# EAGLE board power_input (EAGLE 9.6.2)
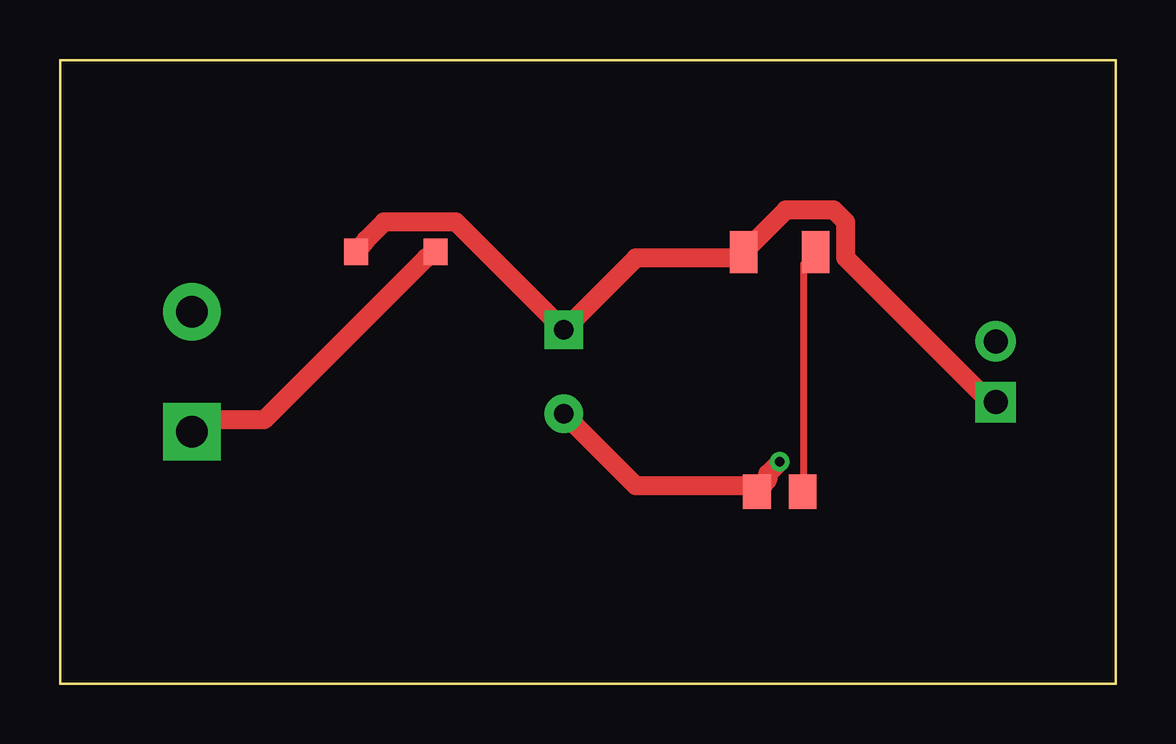
[diagram p0: board, top side]
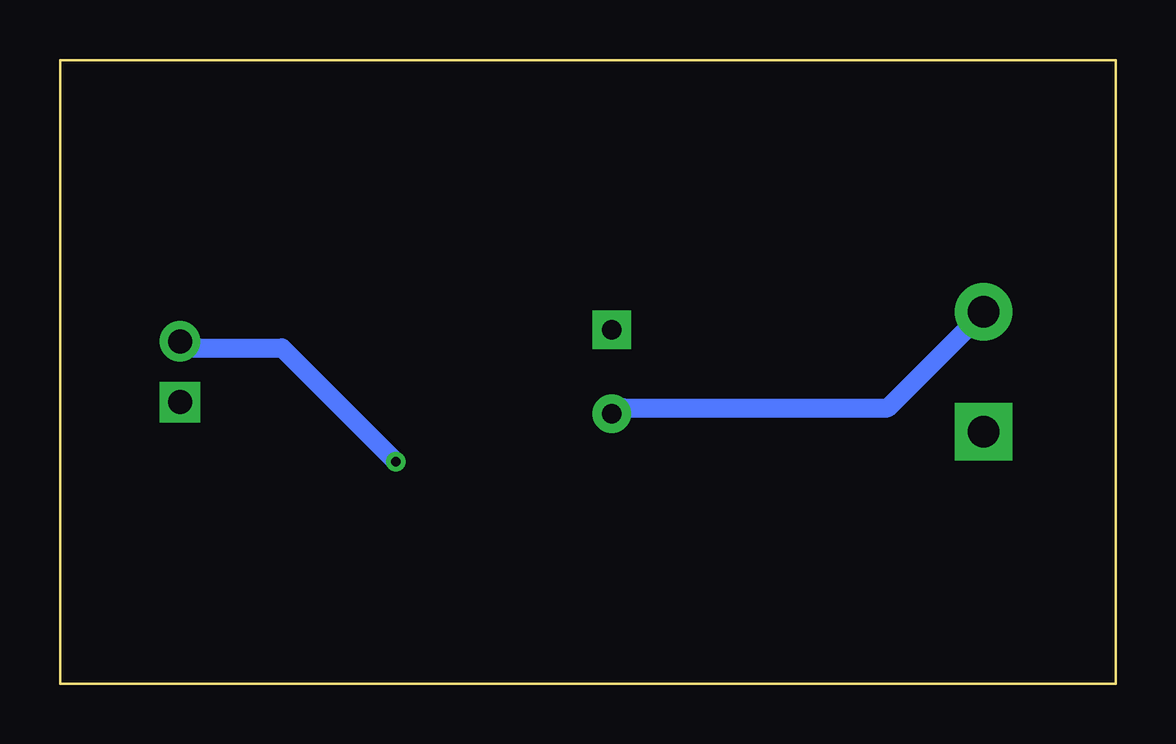
[diagram p1: board, bottom side, seen from below]

Size 44 x 26 mm. Coordinates in mm from the lower left corner, seen from the top.
Outline: 0,0 44,0 44,26 0,26 0,0
Copper layers used: Top, Bottom
Design rules "eh3d-kit": minimum track width 0.15mm, minimum drill 0.3mm, track to track 0.15mm, track to pad 0.15mm, pad to pad 0.15mm, via to via 0.15mm, smd to smd 0.15mm, copper to edge 0.3mm, drill to drill 0.25mm, minimum pad ring 0.15mm, minimum via ring 0.15mm

## Footprints (pad centres in the part's own frame; a part is rotated, then mirrored left to right if it is on the bottom)
C-ELEC-D8 = drill 0.8 pad 1.6 square: 1 -1.75,0 | drill 0.8 pad 1.6: 2 1.75,0
SOD-123 = smd 1 x 1.1: 1 -1.65,0; 2 1.65,0
LED-0805 = smd 1.15 x 1.45: 1 -0.95,0; 2 0.95,0
HDR-1X02 = drill 1 pad 1.7 square: 1 -1.27,0 | drill 1 pad 1.7: 2 1.27,0
CHIP-1206 = smd 1.15 x 1.75: 1 -1.5,0; 2 1.5,0
TERM-2P-5.0 = drill 1.3 pad 2.4 square: 1 -2.5,0 | drill 1.3 pad 2.4: 2 2.5,0

## Placement (x,y rotation side)
C1  220u  [C-ELEC-D8]  21,13 270 top
D1  SERIES  [SOD-123]  14,18 0 top
D2  GREEN  [LED-0805]  30,8 0 top
J1  OUT  [HDR-1X02]  39,13 90 top
R1  2k2  [CHIP-1206]  30,18 0 top
X1  IN  [TERM-2P-5.0]  5.5,13 90 top

## Library data of the parts
C1 D1 D2 J1 R1 X1 = eh3d-kit

## Nets
GND: C1.2 D2.1 J1.2 X1.2
LEDA: D2.2 R1.2
VIN: D1.2 X1.1
VOUT: C1.1 D1.1 J1.1 R1.1

## Tracks (layer width: path | path; a pad name or v marks a point on that pad's centre or on a via)
GND  (via drill 0.4 pad 0.8)
  Top 0.8: C1.2 24,8.25 28.5,8.25 D2.1 29.5,8.5 29.5,8.75 v30,9.25
  Bottom 0.8: C1.2 20.5,11.5 9.5,11.5 X1.2 | J1.2 38.5,14 34.75,14 v30,9.25
LEDA
  Top 0.3: D2.2 31,8.5 31,17.5 R1.2
VIN
  Top 0.8: D1.2 15.25,17.75 8.5,11 6,11 X1.1
VOUT
  Top 0.8: D1.1 12.75,18.5 13.5,19.25 16.5,19.25 C1.1 24,17.75 28,17.75 R1.1 30.25,19.75 32.25,19.75 32.75,19.25 32.75,17.75 38.5,12 J1.1